# Altium PCB control-board.PcbDoc
Units mm, origin at the board's own origin, x right, y up, seen from the top; angles counter-clockwise.
Board outline 92.5 x 55 mm, 2 copper layers (Top Layer, Bottom Layer); 61 components, 58 nets, 224 pads, 28 vias.
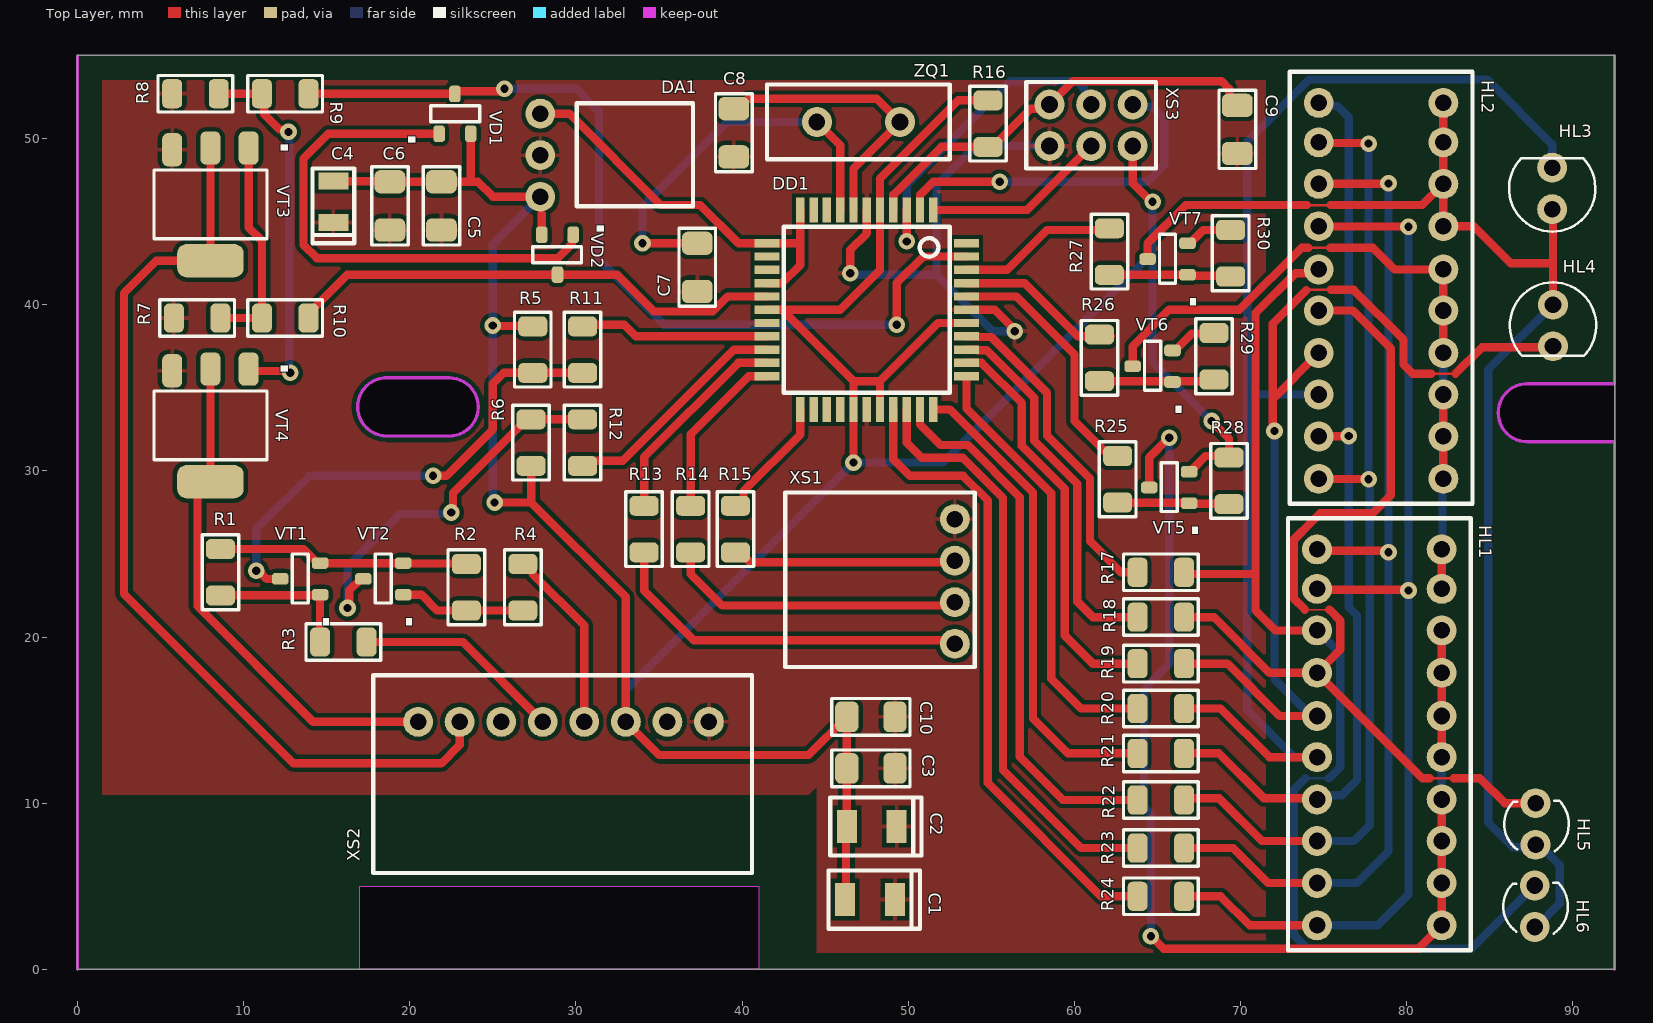
[diagram p0: Top Layer view]
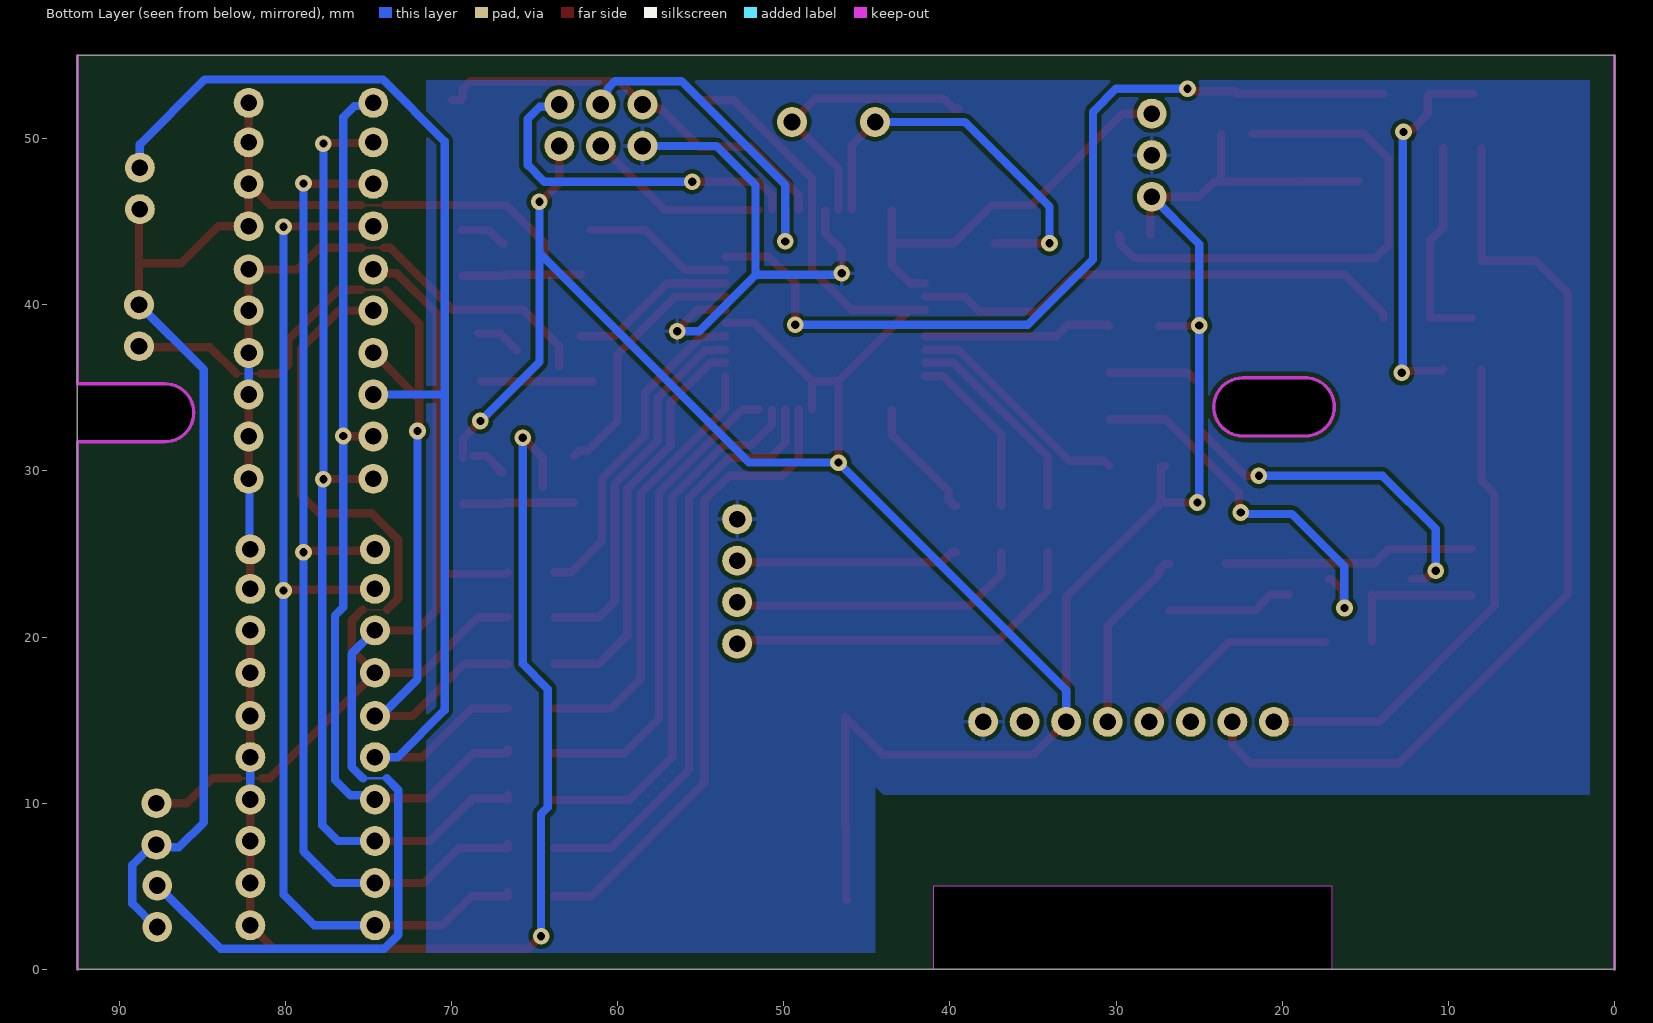
[diagram p1: Bottom Layer view, seen from below]
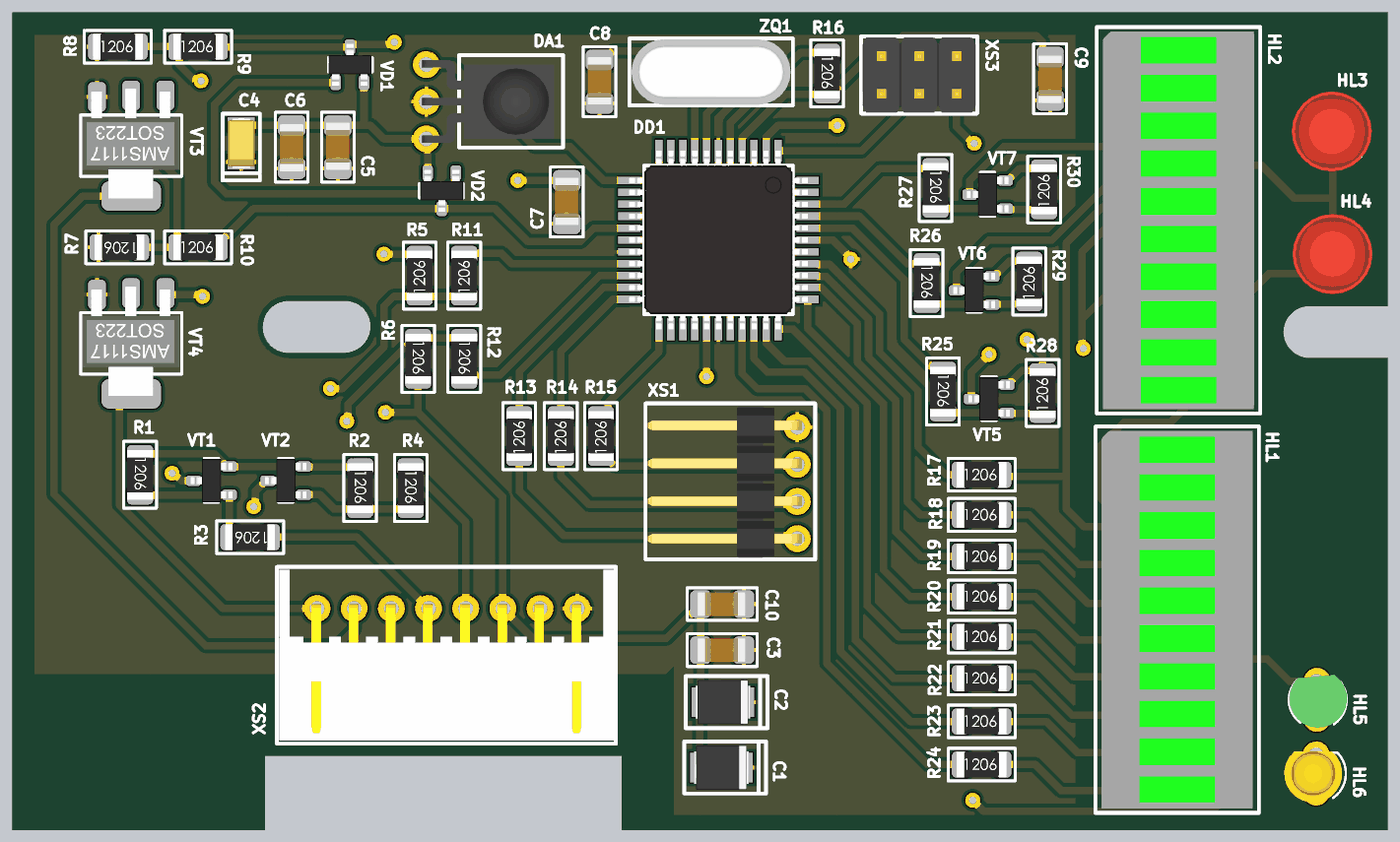
[diagram p2: 3D render of the assembled board from above, using the file's embedded part models]

## Layer stack, top to bottom
Top Solder: solder mask 0.0102, Solder Resist, Dk 3.5
Top Layer: signal copper 0.0356
Dielectric 1: dielectric 0.32, FR-4, Dk 4.8
Bottom Layer: signal copper 0.0356
Bottom Solder: solder mask 0.0102, Solder Resist, Dk 3.5

## Board outline
0,0 92.5,0 92.5,55 0,55
cut-out: 16.852,33.852 cw(c18.6,33.852) 18.6,35.6 22.4,35.6 cw(c22.4,33.9) 24.1,33.9 cw(c22.3,33.9) 22.3,32.1 18.5,32.1 cw(c18.552,33.8)
cut-out: 85.5,33.5 cw(c87.25,33.5) 87.25,35.25 92.5,35.25 92.5,31.75 87.25,31.75 cw(c87.25,33.5)
cut-out: 17,0 17,5 41,5 41,0

## Design rules (kind name [scope] priority, off if disabled: settings)
Clearance [All] p1: gap=0.254 ignorepadtopadclearanceinfootprint=FALSE except(0: Arc-Hole Track-Hole SMDPad-Hole THPad-Hole Via-Hole Fill-Hole Poly-Hole Region-Hole Text-Hole)
PolygonConnect [All] p1: connectstyle=Relief reliefconductorwidth=0.254 reliefentries=4 polygonreliefangle="90 Angle" airgapwidth=0.254
RoutingVias [All] p1: holewidth=0.711 width=1.27 viastyle="Through Hole" minholewidth=0.711 minwidth=1.27 maxholewidth=0.711 maxwidth=1.27
SolderMaskExpansion [All] p1: expansion=0.102 istentingtop=FALSE
Width [All] p1: maxlimit=1 minlimit=0.1 preferedwidth=0.5
30 further rules are at their usual default settings.

## Components (designator, comment, footprint, x,y, rotation, side; value= is the part's Value field where it differs from the comment)
C1 "47 µF" C+_TCAP_SMD-B 47.7,4.2 r180 top
C2 "47 µF" C+_TCAP_SMD-B 47.8,8.6 r180 top
C3 "0.1 µF" C_1206 49.2,12.1 r180 top
C4 "10 µF" C+_TCAP_SMD-A 15.4,46.2 r90 top
C5 "0.1 µF" C_1206 21.9,44.5 r90 top
C6 "0.1 µF" C_1206 18.8,47.4 r270 top
C7 "22 pF" C_1206 37.3,40.8 r90 top
C8 "22 pF" C_1206 39.5,48.9 r90 top
C9 "10 nF" C_1206 69.8,52 r270 top
C10 "0.1 µF" C_1206 49.2,15.2 r180 top
DA1 "TSOP4838" DA_TSOP31238 30.6,49 r270 top
DD1 "ATmega16-16AU" DD_TQFP44_Atmega16 47.5,39.7 r270 top
HL1 "DC-10GWA" HL_DC-10GWA 78.35,14.15 r180 top
HL2 "DC-10GWA" HL_DC-10GWA 78.45,41.025 r180 top
HL3 "L-1503SRD" HL_LED5MM_RED 88.75,47 r90 top
HL4 "L-1503SRD" HL_LED5MM_RED 88.8,38.75 r270 top
HL5 "L-1154GT" HL_LED3MM_GREEN 87.75,8.75 r90 top
HL6 "L-132XYD" HL_LED3MM_YELLOW 87.7,3.8 r90 top
R1 "56 kΩ" R_1206 8.6,25.45 r270 top
R2 "56 kΩ" R_1206 23.4,24.55 r270 top
R3 "12 kΩ" R_1206 17.55,19.7 r180 top
R4 "12 kΩ" R_1206 26.8,24.55 r270 top
R5 "10 kΩ" R_1206 27.4,35.75 r90 top
R6 "10 kΩ" R_1206 27.3,33.25 r270 top
R7 "10 kΩ" R_1206 8.75,39.2 r180 top
R8 "10 kΩ" R_1206 5.55,52.7 r0 top
R9 "100 Ω" R_1206 10.95,52.7 r0 top
R10 "100 Ω" R_1206 10.95,39.2 r0 top
R11 "10 kΩ" R_1206 30.4,35.75 r90 top
R12 "10 kΩ" R_1206 30.4,33.25 r270 top
R13 "1 kΩ" R_1206 34.1,24.95 r90 top
R14 "1 kΩ" R_1206 36.9,24.95 r90 top
R15 "1 kΩ" R_1206 39.6,24.95 r90 top
R16 "10 kΩ" R_1206 54.8,52.45 r270 top
R17 "180 Ω" R_1206 63.65,23.9 r0 top
R18 "180 Ω" R_1206 63.65,21.2 r0 top
R19 "180 Ω" R_1206 63.65,18.4 r0 top
R20 "180 Ω" R_1206 63.65,15.7 r0 top
R21 "180 Ω" R_1206 63.65,13 r0 top
R22 "180 Ω" R_1206 63.65,10.2 r0 top
R23 "180 Ω" R_1206 63.65,7.3 r0 top
R24 "180 Ω" R_1206 63.65,4.4 r0 top
R25 "1 kΩ" R_1206 62.6,31.05 r270 top
R26 "1 kΩ" R_1206 61.5,38.35 r270 top
R27 "1 kΩ" R_1206 62.1,44.75 r270 top
R28 "10 kΩ" R_1206 69.3,27.85 r90 top
R29 "10 kΩ" R_1206 68.4,35.35 r90 top
R30 "10 kΩ" R_1206 69.4,41.55 r90 top
VD1 "BAV23S" VD_SOT-23 22.9,51.5 r90 top
VD2 "BAV23S" VD_SOT-23 28.7,43 r270 top
VT1 "MMBT5551" VT_sot23 13.4,23.5 r180 top
VT2 "MMBT5551" VT_sot23 18.4,23.5 r180 top
VT3 "IRFL4310" VT_SOT223 8.2,46.2 r270 top
VT4 "IRFL4310" VT_SOT223 8.2,32.9 r270 top
VT5 "MMBT5401" VT_sot23 65.7,29 r180 top
VT6 "MMBT5401" VT_sot23 64.7,36.3 r180 top
VT7 "MMBT5401" VT_sot23 65.6,42.75 r180 top
XS1 "PLS-4R" X_DS1022-R 48.1,23.4 r90 top
XS2 "CWF-8R" X_CWF-8R 29.2,11.5 r180 top
XS3 "PLD-6" X_PLD6 61,50.8 r180 top
ZQ1 "12 MHz" ZQ_HC49-S 47,51 r0 top

## Footprints (in the part's own frame and the unit in brackets; to place one, negate y for a bottom-side part, rotate by r counter-clockwise, add the part's x,y. Pads: shape width x height; smd on the part's side, far side on the other; paste and mask are expansions set on the pad)
C+_TCAP_SMD-A [mm]
  rect 1x1.8 smd: 1(-1.25,0) 2(1.25,0)
  silkscreen extent -2.5,-1.25 2,1.25, body extent -1.7,-0.9 1.7,0.9, height 1.8
C+_TCAP_SMD-B [mm]
  rect 1.2x2 smd: 1(-1.5,0) 2(1.5,0)
  silkscreen extent -3,-1.75 2.5,1.75, body extent -1.85,-1.5 1.85,1.5, height 2.1
C_1206 [mm]
  rrect50% 1.4x1.85 smd: 1(0,0) 2(2.9,0)
  silkscreen extent -0.9,-1.1 3.8,1.1, body extent -0.1,-0.8 3.1,0.8, height 1
DA_TSOP31238 [mm]
  round 1.8 hole 1: 1(-2.5,-2.75) 2(0,-2.75) 3(2.5,-2.75)
  silkscreen extent -3.13,-0.55 3.08,6.45, body extent -2.8,-3.04 2.78,5.84, height 4.88
DD_TQFP44_Atmega16 [mm]
  rect 1.5x0.5 smd: 1(-6,4) 2(-6,3.2) 3(-6,2.4) 4(-6,1.6) 5(-6,0.8) 6(-6,0) 7(-6,-0.8) 8(-6,-1.6) 9(-6,-2.4) 10(-6,-3.2) 11(-6,-4) 23(6,-4) 24(6,-3.2) 25(6,-2.4) 26(6,-1.6) 27(6,-0.8) 28(6,0) 29(6,0.8) 30(6,1.6) 31(6,2.4) 32(6,3.2) 33(6,4)
  rect 0.5x1.5 smd: 12(-4,-6) 13(-3.2,-6) 14(-2.4,-6) 15(-1.6,-6) 16(-0.8,-6) 17(0,-6) 18(0.8,-6) 19(1.6,-6) 20(2.4,-6) 21(3.2,-6) 22(4,-6) 34(4,6) 35(3.2,6) 36(2.4,6) 37(1.6,6) 38(0.8,6) 39(0,6) 40(-0.8,6) 41(-1.6,6) 42(-2.4,6) 43(-3.2,6) 44(-4,6)
  silkscreen extent -5,-5 5,5, body extent -6.01,-6.01 6.01,6.01, height 1.61
HL_DC-10GWA [mm]
  round 1.8 hole 1: 1(-3.75,11.5) 2(-3.75,8.95) 3(-3.75,6.425) 4(-3.75,3.925) 5(-3.75,1.375) 6(-3.75,-1.1) 7(-3.75,-3.7) 8(-3.75,-6.25) 9(-3.75,-8.75) 10(-3.75,-11.125) 11(3.75,-11.125) 12(3.75,-8.75) 13(3.75,-6.25) 14(3.75,-3.7) 15(3.75,-1.1) 16(3.75,1.375) 17(3.75,3.925) 18(3.75,6.425) 19(3.75,8.95) 20(3.75,11.5)
  silkscreen extent -5.5,-13 5.5,13, body extent -5.08,-12.7 5.08,12.7, height 8
HL_LED3MM_GREEN [mm]
  round 1.8 hole 1: 1(-1.25,0) 2(1.25,0)
  silkscreen extent -1.64,-2 1.4,1.89, body extent -1.86,-2.03 1.68,1.87, height 6.19
HL_LED3MM_YELLOW [mm]
  round 1.8 hole 1: 1(-1.25,0) 2(1.25,0)
  silkscreen extent -1.64,-2 1.4,1.89, body extent -1.95,-1.75 1.5,2.15, height 6.3
HL_LED5MM_RED [mm]
  round 1.8 hole 1: 1(-1.25,0) 2(1.25,0)
  silkscreen extent -2.6,-2.6 1.83,2.6, body extent -2.7,-2.7 2.7,2.7, height 8.5
R_1206 [mm]
  rrect50% 1.2x1.75 smd: 1(0.15,0) 2(2.95,0)
  silkscreen extent -0.7,-1.1 3.8,1.1, body extent -0.12,-0.86 3.23,0.87, height 0.85
VD_SOT-23 [mm]
  rrect55% 1x0.7 smd: 1(-1.212,1.138) 2(-1.212,-0.762) 3(1.188,0.188)
  silkscreen extent -0.49,-1.31 0.47,1.64, body extent -1.41,-1.26 1.39,1.64, height 1.29
VT_sot23 [mm]
  rrect55% 1x0.7 smd: 1(-1.2,0.95) 2(1.2,0) 3(-1.2,-0.95)
  silkscreen extent -0.48,-1.5 0.48,1.45, body extent -1.4,-1.45 1.4,1.45, height 1.29
VT_SOT223 [mm]
  rrect55% 2x1.2 smd: 1(-3.125,-2.5) 2(-3.225,2.1) 3(-3.225,-0.2)
  rrect55% 2x4 smd: 3(3.55,-0.2)
  silkscreen extent -1.91,-3.6 2.22,3.2, body extent -3.67,-3.48 3.7,3.02, height 1.8
X_CWF-8R [mm]
  round 1.8 hole 1: 1(8.7,-3.4) 2(6.2,-3.4) 3(3.7,-3.4) 4(1.2,-3.4) 5(-1.3,-3.4) 6(-3.8,-3.4) 7(-6.3,-3.4) 8(-8.8,-3.4)
  silkscreen extent -11.4,-6.2 11.4,5.7, body extent -11.25,-6 11.25,5.5, height 5.75
X_DS1022-R [mm]
  round 1.8 hole 1: 1(-3.8,-4.7) 2(-1.3,-4.7) 3(1.2,-4.7) 4(3.7,-4.7)
  silkscreen extent -5.2,-5.9 5.3,5.5, body extent -5.08,-5 5.08,5.35, height 2.54
X_PLD6 [mm]
  round 1.8 hole 1: 1(-2.5,-1.25) 2(-2.5,1.25) 3(0,-1.25) 4(0,1.25) 5(2.5,-1.25) 6(2.5,1.25)
  silkscreen extent -3.9,-2.6 3.9,2.6, body extent -3.81,-2.54 3.81,2.54, height 8.54
ZQ_HC49-S [mm]
  round 1.8 hole 1: 1(-2.5,0) 2(2.5,0)
  silkscreen extent -5.5,-2.25 5.5,2.25, body extent -5.35,-2.21 5.35,2.21, height 3.36

## Part data
C1 C2 C4: library part C_Polarized, "Tantalum capacitor, 10 V, 10%"
C3 C5 C6 C10: library part C_NonPolarized, "Ceramic capacitor, 250 V, 10%"
C7 C8: library part C_NonPolarized, "Ceramic capacitor, 50 V, 5%"
C9: library part C_NonPolarized, "Ceramic capacitor, 50 V, 10%"
DA1: library part DA_IR_Receiver, "Infrared receiver, 38 kHz"
DD1: library part DD_ATmega16_TQFP44, "8-bit AVR microcontroller, 16 MHz, 16 KB Flash"
HL1 HL2: library part HL_LED_Bargraph, "LED bar-graph display"
HL3 HL4: library part HL_LED, "Red LED"
HL5: library part HL_LED, "Green LED"
HL6: library part HL_LED, "Yellow LED"
R1 R2 R5 R6 R7 R8 R11 R12 R13 R14 R15 R16 R17 R18 R19 R20 R21 R22 R23 R24 R25 R26 R27 R28 R29 R30: library part R_RESISTOR, "Chip resistor, 0.25 W, 1%"
R3 R4 R9 R10: library part R_RESISTOR, "Chip resistor, 0.25 W, 5%"
VD1 VD2: library part VD_Dual_Diode, "Dual switching diode"
VT1 VT2: library part VT_Bipolar-NPN, "NPN bipolar transistor, 160 V, 0.6 A"
VT3 VT4: library part VT_MOSFET-N, "N-channel MOSFET, 100 V, 5 A"
VT5 VT6 VT7: library part VT_Bipolar-PNP, "PNP bipolar transistor, 150 V, 0.6 A"
XS1: library part XS_Connector_4Pin, "4-pin connector (socket)"
XS2: library part XS_Connector_8Pin, "8-pin connector (socket)"
XS3: library part XP_Connector_6Pin, "6-pin connector (plug)"
ZQ1: library part ZQ_Crystal, "Quartz crystal resonator"

## Via types
v1: diameter 1, hole 0.5, Top Layer to Bottom Layer, 28 vias

## Nets (pads, with @x,y where several pads share a name; then routed paths per layer and width w, separated by ;. In a path a pad name is that pad's centre, name@x,y a point inside that pad or via, vN(x,y) a via of type N, cw(c..) or ccw(c..) an arc to the next point about the centre after c; other vN are vias at no path point)
+5V: C1.2 C2.2 C3.2 C4.2 C5.2 C6.1 C10.2 DA1.3 DD1.5 DD1.17 DD1.27 DD1.29 DD1.38 R5.2 R6.2 R16.1 R28.2 VD1.2 VD2.2 VT5.3 XS2.6 XS3.2 | length 196.3
  Top Layer w0.5: C4.2 15.425,47.425 18.775,47.425 C6.1 C5.2 23.6,47.4 ; VD1.2 23.662,47.462 23.6,47.4 ; v1(25,38.75) 25.025,38.725 27.375,38.725 R5.2 ; v1@25.247,28.247 v1(25.1,28.1) 27.3,28.1 ; R6.2@27.025,30.3 R6.2 27.3,28.1 ; DA1.3 25,46.5 24.1,47.4 23.6,47.4 ; VD2.2 27.938,45.466 ; DD1.17 42.413,39.7 ; C1.2 46.25,4.25 46.25,8.55 C2.2 C3.2 C10.2 44,12.9 35,12.9 XS2.6 33,22.4 27.3,28.1 ; v1(46.7,30.5) DD1.27 46.7,35.413 ; DD1.29 48.3,35.4 ; DD1.38 51.8,38.9 48.3,35.4 ; R16.1 53,52.3 48.3,47.6 DD1.5 48.3,42.089 45.911,39.7 42.413,39.7 ; XS3.2 63.5,47.312 64.612,46.2 v1(64.7,46.2) ; VT5.3 67.05,29.95 67.15,30.05 67.15,30.159 67.891,30.9 R28.2@68.7,30.9 ; v1(68.25,33) 69.3,31.95 R28.2 ; 42.413,39.7 46.7,35.413 ; 46.7,35.413 46.713,35.4 48.3,35.4
  Bottom Layer w0.5: v1(25.1,28.1) 25.1,28.235 25,28.335 25,43.65 DA1.3 ; XS2.6 33,16.8 v1(46.7,30.5) 52.1,30.5 64.7,43.1 ; v1(64.7,46.2) 64.7,43.1 ; v1(68.25,33) 64.7,36.55 64.7,43.1
A1: R25.2 R28.1 VT5.1 | length 6.7
  Top Layer w0.5: R25.2 62.625,28.075 66.875,28.075 VT5.1 66.925,28.025 69.275,28.025 R28.1
A2: R26.2 R29.1 VT6.1 | length 6.7
  Top Layer w0.5: R26.2 65.9,35.4 R29.1@68.2,35.4
A3: R27.2 R30.1 VT7.1 | length 7.2
  Top Layer w0.5: R27.2@62.182,41.8 VT7.1 66.85,41.75 R30.1@69.35,41.75
GND: C1.1 C2.1 C3.1 C4.1 C5.1 C6.2 C7.1 C8.1 C9.2 C10.1 DA1.2 DD1.6 DD1.18 DD1.28 DD1.39 R7.2 R8.1 VT3.1 VT4.1 XS1.4 XS2.8 XS3.6 | length 32.3
  Top Layer w0.5: v1(46.5,41.9) 46.5,43.3 47.5,44.3 DD1.6 ; DD1.39 55.2,39.7 56.4,38.5 v1(56.4,38.4)
  Bottom Layer w0.5: v1(46.5,41.9) 46.6,41.8 51.5,41.8 ; v1(56.4,38.4) 55.1,38.4 51.7,41.8 51.5,41.8 ; XS3.6 54.05,49.55 51.7,47.2 51.7,42 51.5,41.8
IR_INP: DA1.1 DD1.11 DD1.12 DD1.15 | length 24.6
  Top Layer w0.5: DA1.1 29.6,51.5 35.1,46 37.475,46 39.775,43.7 DD1.12 43.5,43.7 ; DD1.15 42.413,41.3 43.5,42.387 43.5,43.7 ; DD1.11 43.5,43.7
K1: HL1.13 HL2.15 HL6.2 R17.2 | length 68.7
  Top Layer w0.5: R17.2 66.7,23.8 70.9,23.8 ; HL1.13 72.1,20.4 70.9,21.6 70.9,23.8 ; HL2.15 74.471,41.896 73.296,41.896 70.9,39.5 70.9,23.8
  Bottom Layer w0.15: 73.895,11.5 75.311,11.5
  Bottom Layer w0.5: 73.895,11.505 73.196,10.807 73.196,2.068 74.018,1.246 83.896,1.246 HL6.2 ; HL1.13 76.004,18.996 76.004,12.193 75.311,11.5
K2: HL1.14 HL2.16 HL5.2 R18.2 | length 57.5
  Top Layer w0.1: 73.864,21.65 75.336,21.65
  Top Layer w0.15: 81.389,11.5 82.811,11.5
  Top Layer w0.5: R18.2 68.4,21.2 71.75,17.85 HL1.14 ; 73.864,21.65 73.196,22.318 73.196,25.857 74.224,26.885 74.782,27.442 77.942,27.442 79.036,28.536 79.036,37.364 76.75,39.65 HL2.16 ; 75.336,21.65 76.004,20.982 76.004,19.254 HL1.14 ; 81.389,11.5 80.95,11.5 HL1.14 ; 82.811,11.5 84.4,11.5 85.9,10 HL5.2
K3: HL1.15 HL2.17 HL4.2 R19.2 | length 59.7
  Top Layer w0.15: 73.954,40.889 74.685,40.896 cw(c74.687,40.746) 74.689,40.896 ccw(c74.7,42.125) 74.713,40.896 75.097,40.9 75.293,40.918 75.417,40.918 ; 81.464,35.85 82.936,35.85
  Top Layer w0.5: R19.2 69.2,18.4 72.35,15.25 HL1.15 ; v1(72.039,32.4) 71.937,32.502 71.937,34.337 ; 73.954,40.889 71.937,38.873 71.937,34.337 ; HL2.17 71.937,34.337 ; 75.417,40.918 75.436,40.9 76.8,40.9 79.8,37.9 79.8,36.4 80.35,35.85 81.464,35.85 ; 82.936,35.85 84.523,37.438 HL4.2@89.062,37.438
  Bottom Layer w0.5: v1(72.039,32.4) 72.039,17.461 74.25,15.25 HL1.15
K4: HL1.16 HL2.18 HL3.2 R20.2 | length 76
  Top Layer w0.5: R20.2 68.8,15.7 71.725,12.775 HL1.16
  Bottom Layer w0.5: HL1.16 73.225,12.775 70.4,15.6 70.4,34.6 ; HL2.18 70.4,34.6 ; HL3.2 88.75,49.65 84.846,53.554 74.118,53.554 70.4,49.836 70.4,34.6
K5: HL1.17 HL2.11 HL2.19 R21.2 | length 56.4
  Top Layer w0.5: R21.2@66.6,13.275 R21.2 68.7,13 71.4,10.3 74.525,10.3 HL1.17 ; HL2.19 74.712,32.087 76.488,32.087 v1(76.5,32.1)
  Bottom Layer w0.5: HL1.17 74.849,10.474 76.074,10.474 77,11.4 77,21.3 76.5,21.8 76.5,51.3 75.842,51.958 74.892,51.958 HL2.11
K6: HL1.18 HL2.12 HL2.20 R22.2 | length 60
  Top Layer w0.5: R22.2@66.6,10.475 R22.2 66.7,10.3 68.7,10.3 71.275,7.725 HL1.18 ; HL2.20 74.713,29.512 77.688,29.512 v1(77.7,29.5) ; HL2.12 74.738,49.738 77.662,49.738 v1(77.7,49.7)
  Bottom Layer w0.5: HL1.18 76.825,7.725 77.761,8.661 77.761,29.439 v1(77.7,29.5) v1(77.7,49.7)
K7: HL1.11 HL1.19 HL2.13 R23.2 | length 63
  Top Layer w0.5: R23.2@66.6,7.575 R23.2 69.547,7.3 71.647,5.2 HL1.19 ; HL1.11 74.687,25.188 78.812,25.188 v1(78.9,25.1) ; HL2.13 74.712,47.288 78.888,47.288 v1(78.9,47.3)
  Bottom Layer w0.5: HL1.19 77,5.2 78.9,7.1 v1(78.9,25.1) v1(78.9,47.3)
K8: HL1.12 HL1.20 HL2.14 R24.2 | length 66.4
  Top Layer w0.5: R24.2@66.6,4.675 R24.2 68.8,4.4 70.55,2.65 HL1.20 ; HL1.12 74.65,22.85 80.05,22.85 v1(80.1,22.8) ; HL2.14 74.713,44.712 80.088,44.712 v1(80.1,44.7)
  Bottom Layer w0.5: HL1.20 78.25,2.65 80.1,4.5 v1(80.1,44.7)
MISO: DD1.2 XS3.1 | length 21.4
  Top Layer w0.5: DD1.2 50.7,46.613 51.487,47.4 v1(55.5,47.4)
  Bottom Layer w0.5: v1(55.5,47.4) 64.4,47.4 65.4,48.4 65.4,51.2 64.692,51.908 63.642,51.908 XS3.1
MOSI: DD1.1 XS3.4 | length 11.1
  Top Layer w0.5: DD1.1 57.15,45.7 XS3.4
NetC7_2: C7.2 DD1.8 ZQ1.1 | length 24
  Top Layer w0.5: v1(34,43.7) C7.2 ; ZQ1.1 45.9,49.6 DD1.8
  Bottom Layer w0.5: v1(34,43.7) 34,45.9 39.1,51 ZQ1.1
NetC8_2: C8.2 DD1.7 ZQ1.2 | length 17.3
  Top Layer w0.5: C8.2 39.779,51.8 40.383,52.404 48.096,52.404 ZQ1.2 46.7,48.2 DD1.7
NetDD1_19: DD1.19 R11.2 | length 11.4
  Top Layer w0.5: R11.2 30.5,38.8 32.9,38.8 33.6,38.1 DD1.19
NetDD1_20: DD1.20 R12.2 | length 14
  Top Layer w0.5: R12.2 30.719,30.619 32.819,30.619 39.5,37.3 DD1.20
NetDD1_21: DD1.21 R13.2 | length 12.7
  Top Layer w0.5: R13.2 34.1,30.834 39.766,36.5 DD1.21
NetDD1_22: DD1.22 R14.2 | length 10.3
  Top Layer w0.5: R14.2 36.9,32.2 40.4,35.7 DD1.22
NetDD1_23: DD1.23 R15.2 | length 7.5
  Top Layer w0.5: R15.2 39.734,27.9 40.08,28.246 40.08,28.78 43.5,32.2 DD1.23
NetDD1_30: DD1.30 R24.1 | length 38.6
  Top Layer w0.5: DD1.30 49.1,30.7 50.1,29.7 53.302,29.7 54.786,28.217 54.786,11.214 61.6,4.4 R24.1
NetDD1_31: DD1.31 R23.1 | length 35.6
  Top Layer w0.5: DD1.31 49.9,31.7 50.8,30.8 53.268,30.8 55.7,28.368 55.7,12 60.4,7.3 R23.1
NetDD1_32: DD1.32 R22.1 | length 32.5
  Top Layer w0.5: DD1.32 50.7,32.787 51.933,31.554 53.581,31.554 56.7,28.435 56.7,12.8 59.3,10.2 R22.1
NetDD1_33: DD1.33 R21.1 | length 28.8
  Top Layer w0.5: DD1.33 52.501,33.7 57.5,28.701 57.5,15.1 59.6,13 R21.1
NetDD1_34: DD1.34 R20.1 | length 26.3
  Top Layer w0.5: DD1.34 53.5,33.767 58.6,28.667 58.6,17.5 60.4,15.7 R20.1
NetDD1_35: DD1.35 R19.1 | length 24.5
  Top Layer w0.5: DD1.35 54.413,36.5 56.834,34.079 56.834,31.5 59.421,28.913 59.421,20.079 61.1,18.4 R19.1
NetDD1_36: DD1.36 R18.1 | length 22.6
  Top Layer w0.5: DD1.36 54.146,37.3 54.192,37.254 54.725,37.254 57.588,34.391 57.588,31.812 60.175,29.225 60.175,22.125 61.1,21.2 R18.1
NetDD1_37: DD1.37 R17.1 | length 19.9
  Top Layer w0.5: DD1.37 54.146,38.1 54.192,38.054 54.991,38.054 58.342,34.704 58.342,32.125 60.929,29.537 60.929,25.771 62.8,23.9 R17.1
NetDD1_40: DD1.40 R25.1 | length 15.4
  Top Layer w0.5: DD1.40 56.5,40.5 60,37 60,33 61.781,31.219 62.281,31.219 R25.1
NetDD1_41: DD1.41 R26.1 | length 10
  Top Layer w0.5: DD1.41 57,41.3 60.2,38.1 R26.1@62.2,38.1
NetDD1_42: DD1.42 R27.1 | length 9.1
  Top Layer w0.5: DD1.42 55.939,42.1 58.339,44.5 R27.1@61.613,44.5
NetHL1_1: HL1.1 HL1.2 HL1.3 HL1.4 HL1.5 HL1.6 HL1.7 HL1.8 VT5.2 | length 70.4
  Top Layer w0.5: VT5.2 64.5,30.8 v1(65.7,32) ; v1(64.6,2) 65.354,1.246 80.696,1.246 HL1.1 HL1.2 HL1.3 HL1.4 ; HL1.5 HL1.6 HL1.7 HL1.8
  Bottom Layer w0.5: v1(64.6,2) 64.6,9.342 64.2,9.742 64.2,16.876 65.7,18.376 v1(65.7,32) ; HL1.4 HL1.5
NetHL1_9: HL1.9 HL1.10 HL2.1 HL2.2 HL2.3 HL2.4 HL2.5 HL2.6 VT6.2 | length 42.2
  Top Layer w0.15: 74.075,43.425 75.386,43.425
  Top Layer w0.5: VT6.2 63.5,37.5 65.7,39.7 69.934,39.7 73.659,43.425 74.075,43.425 ; 75.386,43.425 77.967,43.425 79.267,42.125 HL2.6 HL2.5 HL2.4 ; HL1.10 HL1.9 HL1.9@82.15,22.95 ; HL2.1 HL2.2 HL2.3
  Bottom Layer w0.5: HL1.10 82.15,25.325 82.15,29.475 HL2.1 ; HL2.3 HL2.4
NetHL2_7: HL2.7 HL2.8 HL2.9 HL2.10 HL3.1 HL4.1 HL5.1 HL6.1 VT7.2 | length 85.2
  Top Layer w0.15: 73.989,46 75.411,46
  Top Layer w0.5: VT7.2 64.4,43.7 66.7,46 73.989,46 ; 75.411,46 80.925,46 HL2.8 ; HL2.10 HL2.9 HL2.8 ; HL3.1@88.467,45.75 HL3.1 ; 88.75,42.5 86.25,42.5 84.025,44.725 HL2.7 HL2.8 ; HL3.1@88.8,45.75 88.8,42.5 HL4.1 88.8,39.586 HL4.1@88.808,39.478
  Bottom Layer w0.5: HL2.7 HL2.7@82.383,44.725 ; HL5.1@87.6,7.3 87.543,7.357 86.393,7.357 84.896,8.854 84.896,36.096 HL4.1 ; HL5.1 88,7.5 89.204,6.296 89.204,3.954 HL6.1@87.8,2.55 ; HL3.1@88.134,45.485 88.149,45.501 88.165,45.485 HL3.1@89.015,45.485
NetR1_1: R1.1 R2.1 VT1.3 VT2.3 | length 15.2
  Top Layer w0.5: R1.1 13.6,25.3 14.45,24.45 VT1.3 VT2.3 19.625,24.425 23.375,24.425 R2.1
NetR1_2: R1.2 R3.2 VT1.1 | length 8.9
  Top Layer w0.5: R1.2 8.625,22.525 14.575,22.525 VT1.1 R3.2
NetR2_2: R2.2 R4.2 VT2.1 | length 7.6
  Top Layer w0.5: VT2.1 20.7,22.55 21.65,21.6 R2.2 R4.2
NetR3_1: R3.1 XS2.4 | length 12.6
  Top Layer w0.5: R3.1 23.2,19.7 XS2.4
NetR4_1: R4.1 XS2.5 | length 11.2
  Top Layer w0.5: R4.1 27.048,24.4 27.394,24.054 27.394,23.806 30.5,20.7 XS2.5
NetR5_1: R5.1 R11.1 VT1.2 | length 29.3
  Top Layer w0.5: v1(10.75,24) 10.885,24 11.385,23.5 VT1.2 ; v1(21.4,29.7) 22.2,29.7 25,32.5 25,35.25 25.65,35.9 R5.1 R11.1
  Bottom Layer w0.5: v1(10.75,24) 10.75,26.5 13.95,29.7 v1(21.4,29.7)
NetR6_1: R6.1 R12.1 VT2.2 | length 23.2
  Top Layer w0.5: v1(16.25,21.75) 16.346,21.846 16.346,22.796 17.05,23.5 VT2.2 ; v1(22.5,27.5) 22.596,27.596 22.596,28.671 27.025,33.1 R12.1
  Bottom Layer w0.5: v1(16.25,21.75) 16.259,21.759 16.259,24.259 19.404,27.404 22.404,27.404 v1(22.5,27.5)
NetR7_1: R7.1 R10.1 VT3.2 | length 13.1
  Top Layer w0.5: R7.1 R10.1 11.1,43.851 10.3,44.651 VT3.2
NetR8_2: R8.2 R9.1 VT4.2 | length 22.9
  Top Layer w0.5: R8.2 R9.1 11.23,52.57 11.23,51.47 12.153,50.547 12.553,50.547 v1(12.7,50.4) ; VT4.2 10.412,36.012 12.688,36.012 v1(12.8,35.9)
  Bottom Layer w0.5: v1(12.7,50.4) 12.75,50.35 12.75,35.95 v1(12.8,35.9)
NetR13_1: R13.1 XS1.1 | length 22.2
  Top Layer w0.5: R13.1 34.1,22.793 37.093,19.8 XS1.1@52.742,19.8
NetR14_1: R14.1 XS1.2 | length 18.2
  Top Layer w0.5: R14.1 36.9,23.8 38.8,21.9 XS1.2@53,21.9
NetR15_1: R15.1 XS1.3 | length 13.6
  Top Layer w0.5: R15.1 39.902,25.1 40.502,24.5 XS1.3@52.986,24.5
NetR29_2: R29.2 VT6.3 | length 2.8
  Top Layer w0.5: VT6.3@66.05,37.25 67.07,38.27 68.37,38.27 R29.2
NetR30_2: R30.2 VT7.3 | length 2.9
  Top Layer w0.5: VT7.3 66.95,43.7 67.75,44.5 R30.2
NetVD1_1: VD1.1 VD2.1 | length 31.4
  Top Layer w0.5: VD1.1 15.088,50.288 13.6,48.8 13.6,43.6 14.4,42.8 28.426,42.8 28.442,42.816 28.916,42.816 29.738,43.638 29.738,44.112 VD2.1
NetVT3_3: VT3.3 XS2.2 | length 57.2
  Top Layer w0.5: VT3.3@8,49.425 8,42.65 4.75,42.65 2.8,40.7 2.8,22.6 13,12.4 21.9,12.4 23,13.5 XS2.2
NetVT4_3: VT4.3 XS2.1 | length 30.8
  Top Layer w0.5: VT4.3@8,36.125 8,29.35 7.948,29.35 7.221,28.623 7.221,21.867 14.188,14.9 XS2.1
RESET: C9.1 DD1.4 R16.2 XS3.5 | length 25.4
  Top Layer w0.5: DD1.4 49.1,46.613 51.987,49.5 R16.2 55.075,49.5 57.376,51.801 58.251,51.801 XS3.5 59.904,53.454 68.846,53.454 69.31,52.99 69.31,52.442 69.431,52.322 C9.1@69.978,52.322
SCK: DD1.3 XS3.3 | length 19.9
  Top Layer w0.5: v1(49.9,43.811) DD1.3
  Bottom Layer w0.5: v1(49.9,43.811) 49.9,47.2 56.154,53.454 60.146,53.454 60.608,52.992 60.608,52.794 61,52.402 XS3.3
YPR1: DD1.43 R9.2 VD1.3 | length 54
  Top Layer w0.5: R9.2 13.906,52.694 22.706,52.694 22.706,52.747 22.812,52.853 25.553,52.853 v1(25.7,53) ; v1(49.3,38.8) 49.3,41.3 50.9,42.9 DD1.43
  Bottom Layer w0.5: v1(25.7,53) 30,53 31.387,51.613 31.387,42.713 35.3,38.8 v1(49.3,38.8)
YPR2: DD1.16 R10.2 VD2.3 | length 30.1
  Top Layer w0.5: R10.2 13.9,39.475 16.225,41.8 29.1,41.8 32.487,41.8 34.691,39.596 38.229,39.596 39.133,40.5 DD1.16
pads on no net: DD1.9 DD1.10 DD1.13 DD1.14 DD1.24 DD1.25 DD1.26 DD1.44 XS2.3 XS2.7

## Polygon pours and split planes (outlines as drawn)
GND on Bottom Layer "GND_L02_P000" (solid, pour order 0): 1.5,53.5 71.5,53.5 71.5,1 44.5,1 44.5,11 44,10.5 1.5,10.5
GND on Top Layer "GND_L01_P001" (solid, pour order 1): 1.5,53.5 71.5,53.5 71.5,1 44.5,1 44.5,11 44,10.5 1.5,10.5

## Keep-outs
Keep-Out Layer:
  lines w0.2: 0,0 0,55 ; 18.488,35.597 22.365,35.597 cw(c22.365,33.847) 22.365,32.097 18.615,32.097 ; 22.36,35.603 18.61,35.603 ccw(c18.61,33.853) 18.61,32.103 22.487,32.103 ; 92.5,0 92.5,31.75 87.25,31.75 cw(c87.25,33.5) 87.25,35.25 92.5,35.25 92.5,55

## Silkscreen, mask and mechanical layers (free items; w line width, h text height)
Mechanical 1:
  lines w0.15: 92.5,0 41,0 41,5 17,5 17,0 0,0 0,55 92.5,55
Board Shape:
  lines w0.254: 92.51,31.736 92.512,31.735